# Altium PCB fotolitoTop.PcbDoc (part 2 of 4)
Units mil, origin at the board's own origin, x right, y up, seen from the top; angles counter-clockwise.
Board outline 7874.02 x 11220.47 mil, 2 copper layers (Top Layer, Bottom Layer); 110 components, 0 nets, 500 pads, 136 vias.
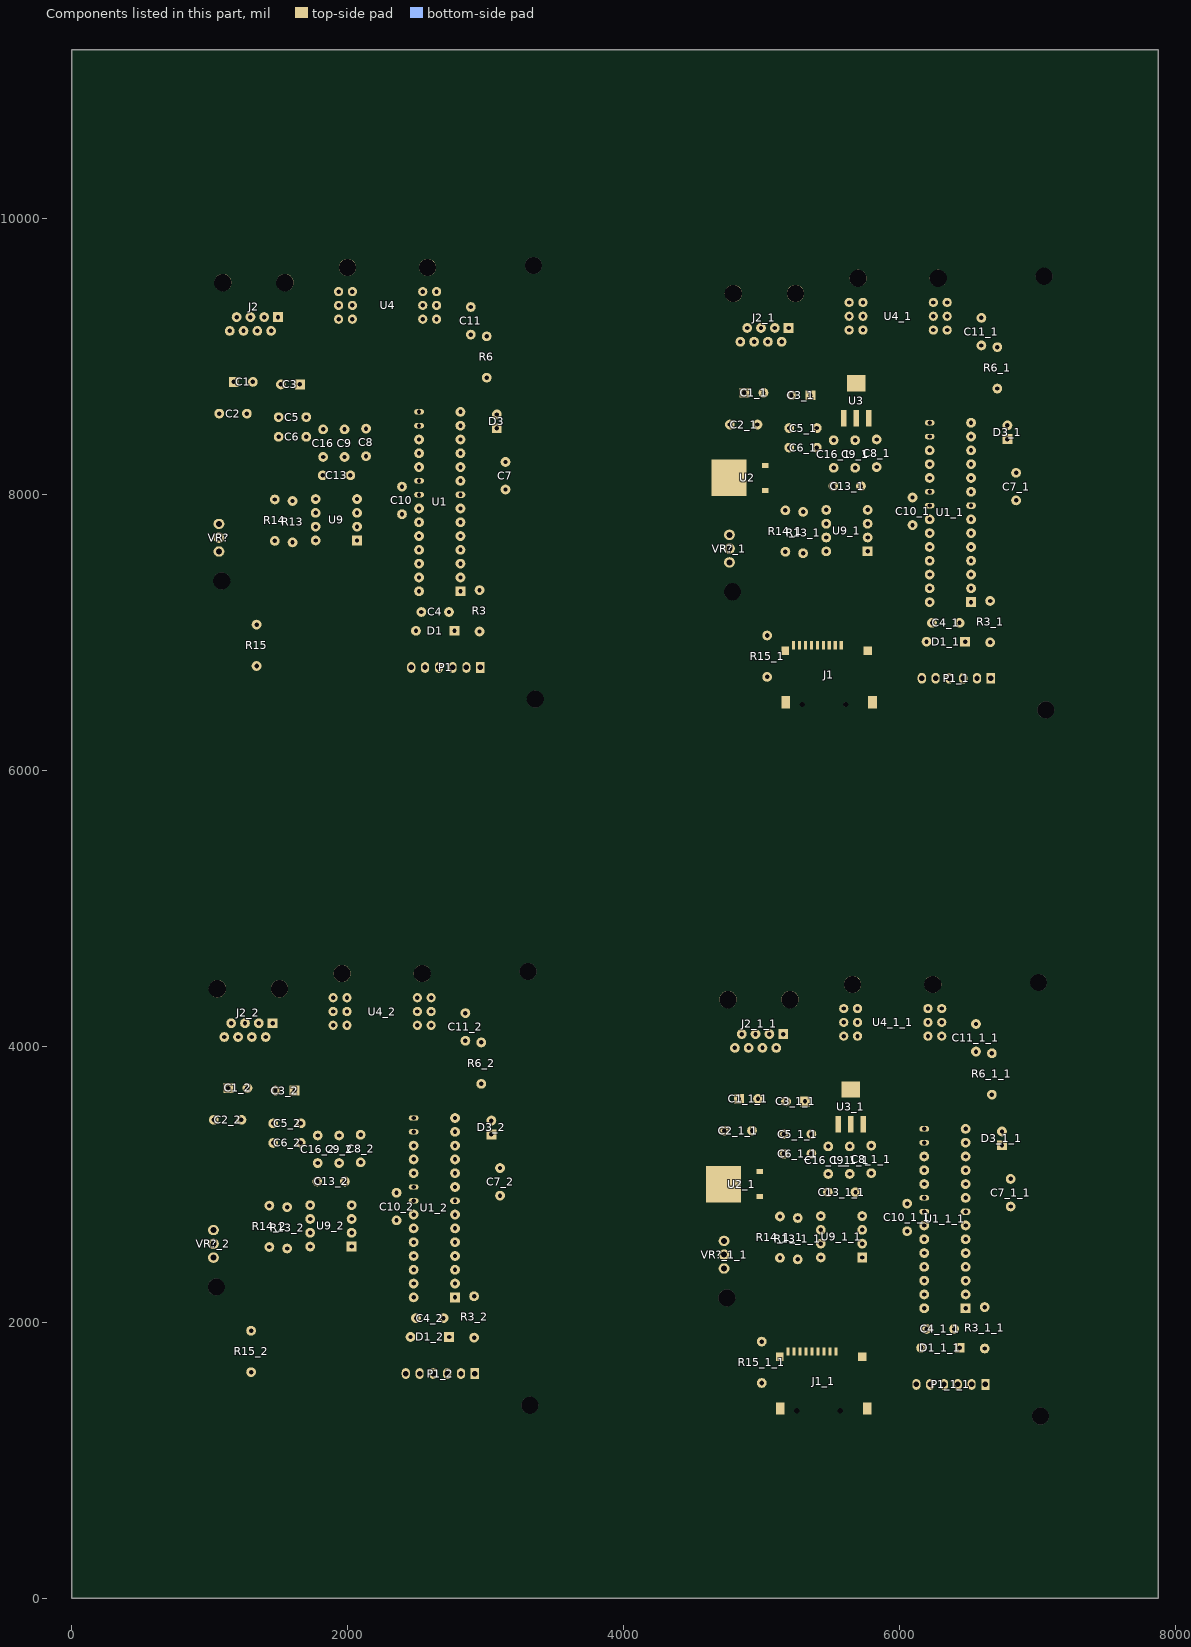
[diagram p2: the components of this part, seen from the top]

## Via types
v1: diameter 70.87, hole 27.56, Top Layer to Bottom Layer, 136 vias

## Nets (pads, with @x,y where several pads share a name; then routed paths per layer and width w, separated by ;. In a path a pad name is that pad's centre, name@x,y a point inside that pad or via, vN(x,y) a via of type N, cw(c..) or ccw(c..) an arc to the next point about the centre after c; other vN are vias at no path point) (continued)
copper on no net: (continued)
  Top Layer w1: 6833.5,2047.09 6833.5,2105.09 ; 6834.5,2042.09 6834.5,2110.09 ; 6835.5,2039.09 6835.5,2113.09 ; 6835.5,2087.09 6835.5,2103.09 ; 6836.5,1798.09 6836.5,1915.09 ; 6836.5,2036.09 6836.5,2117.09 ; 6836.5,2079.09 6836.5,2112.09 ; 6836.5,2234.09 6836.5,2301.09 ; 6837.5,1798.09 6837.5,1923.09 ; 6837.5,2033.09 6837.5,2119.09 ; 6837.5,2071.09 6837.5,2121.09 ; 6837.5,2234.09 6837.5,2301.09 ; 6838.5,1798.09 6838.5,1931.09 ; 6838.5,2031.09 6838.5,2122.09 ; 6838.5,2234.09 6838.5,2301.09 ; 6839.5,1798.09 6839.5,1934.09 ; 6839.5,2029.09 6839.5,2125.09 ; 6839.5,2233.09 6839.5,2301.09 ; 6840.5,1798.09 6840.5,1939.09 ; 6840.5,2026.09 6840.5,2127.09 ; 6840.5,2233.09 6840.5,2302.09 ; 6841.5,1798.09 6841.5,1942.09 ; 6841.5,2025.09 6841.5,2129.09 ; 6841.5,2233.09 6841.5,2302.09 ; 6842.5,1798.09 6842.5,1945.09 ; 6842.5,2022.09 6842.5,2131.09 ; 6842.5,2233.09 6842.5,2302.09 ; 6843.5,1798.09 6843.5,1947.09 ; 6843.5,2021.09 6843.5,2132.09 ; 6843.5,2232.09 6843.5,2303.09 ; 6844.5,1798.09 6844.5,1949.09 ; 6844.5,2019.09 6844.5,2134.09 ; 6844.5,2232.09 6844.5,2303.09 ; 6845.5,1798.09 6845.5,1951.09 ; 6845.5,2018.09 6845.5,2135.09 ; 6845.5,2231.09 6845.5,2304.09 ; 6846.5,1798.09 6846.5,1953.09 ; 6846.5,2016.09 6846.5,2136.09 ; 6846.5,2231.09 6846.5,2304.09 ; 6847.5,1798.09 6847.5,1955.09 ; 6847.5,2015.09 6847.5,2138.09 ; 6847.5,2231.09 6847.5,2304.09 ; 6848.5,1798.09 6848.5,1956.09 ; 6848.5,2014.09 6848.5,2139.09 ; 6848.5,2230.09 6848.5,2305.09 ; 6849.5,1798.09 6849.5,1957.09 ; 6849.5,2013.09 6849.5,2140.09 ; 6849.5,2230.09 6849.5,2305.09 ; 6850.5,1798.09 6850.5,1959.09 ; 6850.5,2011.09 6850.5,2141.09 ; 6850.5,2230.09 6850.5,2306.09 ; 6851.5,1798.09 6851.5,1960.09 ; 6851.5,2011.09 6851.5,2142.09 ; 6851.5,2229.09 6851.5,2306.09 ; 6852.5,1798.09 6852.5,1961.09 ; 6852.5,2009.09 6852.5,2143.09 ; 6852.5,2229.09 6852.5,2306.09 ; 6853.5,1798.09 6853.5,1962.09 ; 6853.5,2008.09 6853.5,2144.09 ; 6853.5,2228.09 6853.5,2307.09 ; 6854.5,1798.09 6854.5,1963.09 ; 6854.5,2008.09 6854.5,2145.09 ; 6854.5,2228.09 6854.5,2307.09 ; 6855.5,1798.09 6855.5,1964.09 ; 6855.5,2007.09 6855.5,2146.09 ; 6855.5,2228.09 6855.5,2307.09 ; 6856.5,1798.09 6856.5,1965.09 ; 6856.5,2006.09 6856.5,2147.09 ; 6856.5,2227.09 6856.5,2307.09 ; 6857.5,1798.09 6857.5,1966.09 ; 6857.5,2005.09 6857.5,2148.09 ; 6857.5,2227.09 6857.5,2308.09 ; 6858.5,1798.09 6858.5,1967.09 ; 6858.5,2004.09 6858.5,2148.09 ; 6858.5,2227.09 6858.5,2308.09 ; 6859.5,1798.09 6859.5,1967.09 ; 6859.5,2004.09 6859.5,2149.09 ; 6859.5,2226.09 6859.5,2309.09 ; 6860.5,1798.09 6860.5,1914.09 ; 6860.5,1915.09 6860.5,1968.09 ; 6860.5,2003.09 6860.5,2149.09 ; 6860.5,2226.09 6860.5,2309.09 ; 6861.5,1798.09 6861.5,1914.09 ; 6861.5,1916.09 6861.5,1918.09 ; 6861.5,1920.09 6861.5,1969.09 ; 6861.5,2002.09 6861.5,2150.09 ; 6861.5,2225.09 6861.5,2309.09 ; 6862.5,1798.09 6862.5,1799.09 ; 6862.5,1801.09 6862.5,1811.09 ; 6862.5,1813.09 6862.5,1875.09 ; 6862.5,1882.09 6862.5,1885.09 ; 6862.5,1886.09 6862.5,1914.09 ; 6862.5,1920.09 6862.5,1970.09 ; 6862.5,2002.09 6862.5,2151.09 ; 6862.5,2225.09 6862.5,2310.09 ; 6863.5,1798.09 6863.5,1799.09 ; 6863.5,1801.09 6863.5,1805.09 ; 6863.5,1806.09 6863.5,1811.09 ; 6863.5,1813.09 6863.5,1860.09 ; 6863.5,1861.09 6863.5,1875.09 ; 6863.5,1882.09 6863.5,1884.09 ; 6863.5,1886.09 6863.5,1914.09 ; 6863.5,1916.09 6863.5,1970.09 ; 6863.5,2001.09 6863.5,2152.09 ; 6863.5,2225.09 6863.5,2310.09 ; 6864.5,1798.09 6864.5,1800.09 ; 6864.5,1801.09 6864.5,1805.09 ; 6864.5,1806.09 6864.5,1811.09 ; 6864.5,1813.09 6864.5,1835.09 ; 6864.5,1837.09 6864.5,1841.09 ; 6864.5,1843.09 6864.5,1860.09 ; 6864.5,1861.09 6864.5,1873.09 ; 6864.5,1885.09 6864.5,1914.09 ; 6864.5,1915.09 6864.5,1971.09 ; 6864.5,2001.09 6864.5,2152.09 ; 6864.5,2225.09 6864.5,2310.09 ; 6865.5,1798.09 6865.5,1799.09 ; 6865.5,1802.09 6865.5,1805.09 ; 6865.5,1806.09 6865.5,1810.09 ; 6865.5,1813.09 6865.5,1835.09 ; 6865.5,1837.09 6865.5,1841.09 ; 6865.5,1843.09 6865.5,1855.09 ; 6865.5,1856.09 6865.5,1859.09 ; 6865.5,1862.09 6865.5,1873.09 ; 6865.5,1884.09 6865.5,1914.09 ; 6865.5,1915.09 6865.5,1972.09 ; 6865.5,2000.09 6865.5,2153.09 ; 6865.5,2224.09 6865.5,2311.09 ; 6866.5,1798.09 6866.5,1799.09 ; 6866.5,1802.09 6866.5,1805.09 ; 6866.5,1807.09 6866.5,1810.09 ; 6866.5,1812.09 6866.5,1842.09 ; 6866.5,1843.09 6866.5,1855.09 ; 6866.5,1862.09 6866.5,1872.09 ; 6866.5,1883.09 6866.5,1900.09 ; 6866.5,1901.09 6866.5,1913.09 ; 6866.5,1916.09 6866.5,1972.09 ; 6866.5,1999.09 6866.5,2153.09 ; 6866.5,2224.09 6866.5,2311.09 ; 6867.5,1798.09 6867.5,1799.09 ; 6867.5,1802.09 6867.5,1805.09 ; 6867.5,1807.09 6867.5,1811.09 ; 6867.5,1812.09 6867.5,1842.09 ; 6867.5,1843.09 6867.5,1855.09 ; 6867.5,1862.09 6867.5,1872.09 ; 6867.5,1882.09 6867.5,1899.09 ; 6867.5,1901.09 6867.5,1913.09 ; 6867.5,1917.09 6867.5,1972.09 ; 6867.5,1999.09 6867.5,2154.09 ; 6867.5,2223.09 6867.5,2311.09 ; 6868.5,1798.09 6868.5,1799.09 ; 6868.5,1807.09 6868.5,1842.09 ; 6868.5,1843.09 6868.5,1854.09 ; 6868.5,1863.09 6868.5,1871.09 ; 6868.5,1884.09 6868.5,1890.09 ; 6868.5,1891.09 6868.5,1898.09 ; 6868.5,1900.09 6868.5,1911.09 ; 6868.5,1912.09 6868.5,1913.09 ; 6868.5,1918.09 6868.5,1973.09 ; 6868.5,1998.09 6868.5,2154.09 ; 6868.5,2223.09 6868.5,2312.09 ; 6869.5,1807.09 6869.5,1811.09 ; 6869.5,1812.09 6869.5,1816.09 ; 6869.5,1817.09 6869.5,1842.09 ; 6869.5,1843.09 6869.5,1853.09 ; 6869.5,1867.09 6869.5,1870.09 ; 6869.5,1887.09 6869.5,1889.09 ; 6869.5,1891.09 6869.5,1898.09 ; 6869.5,1901.09 6869.5,1914.09 ; 6869.5,1917.09 6869.5,1932.09 ; 6869.5,1933.09 6869.5,1973.09 ; 6869.5,1998.09 6869.5,2155.09 ; 6869.5,2223.09 6869.5,2312.09 ; 6870.5,1807.09 6870.5,1811.09 ; 6870.5,1812.09 6870.5,1814.09 ; 6870.5,1817.09 6870.5,1842.09 ; 6870.5,1843.09 6870.5,1852.09 ; 6870.5,1867.09 6870.5,1869.09 ; 6870.5,1887.09 6870.5,1889.09 ; 6870.5,1892.09 6870.5,1899.09 ; 6870.5,1901.09 6870.5,1931.09 ; 6870.5,1933.09 6870.5,1974.09 ; 6870.5,1998.09 6870.5,2155.09 ; 6870.5,2222.09 6870.5,2313.09 ; 6871.5,1807.09 6871.5,1812.09 ; 6871.5,1818.09 6871.5,1822.09 ; 6871.5,1823.09 6871.5,1842.09 ; 6871.5,1843.09 6871.5,1852.09 ; 6871.5,1892.09 6871.5,1899.09 ; 6871.5,1901.09 6871.5,1930.09 ; 6871.5,1933.09 6871.5,1974.09 ; 6871.5,1997.09 6871.5,2156.09 ; 6871.5,2222.09 6871.5,2313.09 ; 6872.5,1807.09 6872.5,1812.09 ; 6872.5,1823.09 6872.5,1851.09 ; 6872.5,1893.09 6872.5,1897.09 ; 6872.5,1900.09 6872.5,1910.09 ; 6872.5,1912.09 6872.5,1930.09 ; 6872.5,1932.09 6872.5,1975.09 ; 6872.5,1997.09 6872.5,2156.09 ; 6872.5,2222.09 6872.5,2313.09 ; 6872.87,7165.2 6872.87,7223.2 ; 6873.5,1807.09 6873.5,1812.09 ; 6873.5,1823.09 6873.5,1836.09 ; 6873.5,1838.09 6873.5,1842.09 ; 6873.5,1844.09 6873.5,1851.09 ; 6873.5,1899.09 6873.5,1911.09 ; 6873.5,1920.09 6873.5,1930.09 ; 6873.5,1934.09 6873.5,1975.09 ; 6873.5,1996.09 6873.5,2157.09 ; 6873.5,2221.09 6873.5,2314.09 ; 6873.87,7160.2 6873.87,7228.2 ; 6874.5,1807.09 6874.5,1812.09 ; 6874.5,1823.09 6874.5,1837.09 ; 6874.5,1839.09 6874.5,1841.09 ; 6874.5,1844.09 6874.5,1851.09 ; 6874.5,1900.09 6874.5,1911.09 ; 6874.5,1920.09 6874.5,1930.09 ; 6874.5,1935.09 6874.5,1975.09 ; 6874.5,1996.09 6874.5,2157.09 ; 6874.5,2221.09 6874.5,2314.09 ; 6874.87,7157.2 6874.87,7231.2 ; 6874.87,7205.2 6874.87,7221.2 ; 6875.5,1807.09 6875.5,1812.09 ; 6875.5,1823.09 6875.5,1838.09 ; 6875.5,1844.09 6875.5,1850.09 ; 6875.5,1901.09 6875.5,1910.09 ; 6875.5,1920.09 6875.5,1930.09 ; 6875.5,1935.09 6875.5,1975.09 ; 6875.5,1996.09 6875.5,2072.09 ; 6875.5,2079.09 6875.5,2157.09 ; 6875.5,2220.09 6875.5,2314.09 ; 6875.87,6916.2 6875.87,7033.2 ; 6875.87,7154.2 6875.87,7235.2 ; 6875.87,7197.2 6875.87,7230.2 ; 6875.87,7352.2 6875.87,7419.2 ; 6876.5,1807.09 6876.5,1811.09 ; 6876.5,1823.09 6876.5,1838.09 ; 6876.5,1844.09 6876.5,1850.09 ; 6876.5,1900.09 6876.5,1910.09 ; 6876.5,1920.09 6876.5,1930.09 ; 6876.5,1936.09 6876.5,1976.09 ; 6876.5,1995.09 6876.5,2066.09 ; 6876.5,2085.09 6876.5,2158.09 ; 6876.5,2220.09 6876.5,2315.09 ; 6876.87,6916.2 6876.87,7041.2 ; 6876.87,7151.2 6876.87,7237.2 ; 6876.87,7189.2 6876.87,7239.2 ; 6876.87,7352.2 6876.87,7419.2 ; 6877.5,1807.09 6877.5,1811.09 ; 6877.5,1823.09 6877.5,1834.09 ; 6877.5,1836.09 6877.5,1838.09 ; 6877.5,1844.09 6877.5,1850.09 ; 6877.5,1901.09 6877.5,1910.09 ; 6877.5,1920.09 6877.5,1930.09 ; 6877.5,1936.09 6877.5,1976.09 ; 6877.5,1995.09 6877.5,2063.09 ; 6877.5,2089.09 6877.5,2158.09 ; 6877.5,2220.09 6877.5,2315.09 ; 6877.87,6916.2 6877.87,7049.2 ; 6877.87,7149.2 6877.87,7240.2 ; 6877.87,7352.2 6877.87,7419.2 ; 6878.5,1807.09 6878.5,1812.09 ; 6878.5,1819.09 6878.5,1834.09 ; 6878.5,1844.09 6878.5,1850.09 ; 6878.5,1901.09 6878.5,1910.09 ; 6878.5,1920.09 6878.5,1930.09 ; 6878.5,1936.09 6878.5,1976.09 ; 6878.5,1995.09 6878.5,2061.09 ; 6878.5,2090.09 6878.5,2158.09 ; 6878.5,2219.09 6878.5,2315.09 ; 6878.87,6916.2 6878.87,7052.2 ; 6878.87,7147.2 6878.87,7243.2 ; 6878.87,7351.2 6878.87,7419.2 ; 6879.5,1807.09 6879.5,1812.09 ; 6879.5,1819.09 6879.5,1834.09 ; 6879.5,1844.09 6879.5,1850.09 ; 6879.5,1901.09 6879.5,1905.09 ; 6879.5,1906.09 6879.5,1910.09 ; 6879.5,1920.09 6879.5,1931.09 ; 6879.5,1935.09 6879.5,1976.09 ; 6879.5,1995.09 6879.5,2059.09 ; 6879.5,2092.09 6879.5,2159.09 ; 6879.5,2219.09 6879.5,2316.09 ; 6879.87,6916.2 6879.87,7057.2 ; 6879.87,7144.2 6879.87,7245.2 ; 6879.87,7351.2 6879.87,7420.2 ; 6880.5,1807.09 6880.5,1811.09 ; 6880.5,1819.09 6880.5,1834.09 ; 6880.5,1844.09 6880.5,1850.09 ; 6880.5,1901.09 6880.5,1905.09 ; 6880.5,1906.09 6880.5,1910.09 ; 6880.5,1920.09 6880.5,1931.09 ; 6880.5,1935.09 6880.5,1977.09 ; 6880.5,1994.09 6880.5,2058.09 ; 6880.5,2093.09 6880.5,2159.09 ; 6880.5,2219.09 6880.5,2316.09 ; 6880.87,6916.2 6880.87,7060.2 ; 6880.87,7143.2 6880.87,7247.2 ; 6880.87,7351.2 6880.87,7420.2 ; 6881.5,1807.09 6881.5,1811.09 ; 6881.5,1821.09 6881.5,1834.09 ; 6881.5,1845.09 6881.5,1850.09 ; 6881.5,1900.09 6881.5,1910.09 ; 6881.5,1919.09 6881.5,1931.09 ; 6881.5,1935.09 6881.5,1977.09 ; 6881.5,1994.09 6881.5,2057.09 ; 6881.5,2095.09 6881.5,2159.09 ; 6881.5,2218.09 6881.5,2316.09 ; 6881.87,6916.2 6881.87,7063.2 ; 6881.87,7140.2 6881.87,7249.2 ; 6881.87,7351.2 6881.87,7420.2 ; 6882.5,1807.09 6882.5,1812.09 ; 6882.5,1822.09 6882.5,1834.09 ; 6882.5,1845.09 6882.5,1850.09 ; 6882.5,1900.09 6882.5,1910.09 ; 6882.5,1919.09 6882.5,1930.09 ; 6882.5,1935.09 6882.5,1977.09 ; 6882.5,1994.09 6882.5,2056.09 ; 6882.5,2095.09 6882.5,2159.09 ; 6882.5,2218.09 6882.5,2317.09 ; 6882.87,6916.2 6882.87,7065.2 ; 6882.87,7139.2 6882.87,7250.2 ; 6882.87,7350.2 6882.87,7421.2 ; 6883.5,1807.09 6883.5,1812.09 ; 6883.5,1823.09 6883.5,1834.09 ; 6883.5,1845.09 6883.5,1850.09 ; 6883.5,1860.09 6883.5,1910.09 ; 6883.5,1919.09 6883.5,1930.09 ; 6883.5,1934.09 6883.5,1977.09 ; 6883.5,1994.09 6883.5,2055.09 ; 6883.5,2096.09 6883.5,2160.09 ; 6883.5,2218.09 6883.5,2317.09 ; 6883.87,6916.2 6883.87,7067.2 ; 6883.87,7137.2 6883.87,7252.2 ; 6883.87,7350.2 6883.87,7421.2 ; 6884.5,1808.09 6884.5,1811.09 ; 6884.5,1824.09 6884.5,1834.09 ; 6884.5,1845.09 6884.5,1850.09 ; 6884.5,1860.09 6884.5,1900.09 ; 6884.5,1903.09 6884.5,1910.09 ; 6884.5,1919.09 6884.5,1930.09 ; 6884.5,1932.09 6884.5,1977.09 ; 6884.5,1994.09 6884.5,2055.09 ; 6884.5,2097.09 6884.5,2160.09 ; 6884.5,2218.09 6884.5,2318.09 ; 6884.87,6916.2 6884.87,7069.2 ; 6884.87,7136.2 6884.87,7253.2 ; 6884.87,7349.2 6884.87,7422.2 ; 6885.5,1808.09 6885.5,1809.09 ; 6885.5,1826.09 6885.5,1834.09 ; 6885.5,1844.09 6885.5,1850.09 ; 6885.5,1860.09 6885.5,1901.09 ; 6885.5,1907.09 6885.5,1910.09 ; 6885.5,1920.09 6885.5,1930.09 ; 6885.5,1931.09 6885.5,1977.09 ; 6885.5,1993.09 6885.5,2055.09 ; 6885.5,2098.09 6885.5,2160.09 ; 6885.5,2217.09 6885.5,2318.09 ; 6885.87,6916.2 6885.87,7071.2 ; 6885.87,7134.2 6885.87,7254.2 ; 6885.87,7349.2 6885.87,7422.2 ; 6886.5,1828.09 6886.5,1834.09 ; 6886.5,1844.09 6886.5,1850.09 ; 6886.5,1860.09 6886.5,1901.09 ; 6886.5,1909.09 6886.5,1910.09 ; 6886.5,1920.09 6886.5,1930.09 ; 6886.5,1931.09 6886.5,1977.09 ; 6886.5,1993.09 6886.5,2054.09 ; 6886.5,2098.09 6886.5,2160.09 ; 6886.5,2217.09 6886.5,2318.09 ; 6886.87,6916.2 6886.87,7073.2 ; 6886.87,7133.2 6886.87,7256.2 ; 6886.87,7349.2 6886.87,7422.2 ; 6887.5,1828.09 6887.5,1834.09 ; 6887.5,1844.09 6887.5,1850.09 ; 6887.5,1860.09 6887.5,1900.09 ; 6887.5,1910.09 6887.5,1912.09 ; 6887.5,1920.09 6887.5,1930.09 ; 6887.5,1931.09 6887.5,1977.09 ; 6887.5,1993.09 6887.5,2054.09 ; 6887.5,2099.09 6887.5,2161.09 ; 6887.5,2216.09 6887.5,2319.09 ; 6887.87,6916.2 6887.87,7074.2 ; 6887.87,7132.2 6887.87,7257.2 ; 6887.87,7348.2 6887.87,7423.2 ; 6888.5,1828.09 6888.5,1835.09 ; 6888.5,1844.09 6888.5,1850.09 ; 6888.5,1860.09 6888.5,1900.09 ; 6888.5,1910.09 6888.5,1913.09 ; 6888.5,1920.09 6888.5,1930.09 ; 6888.5,1931.09 6888.5,1977.09 ; 6888.5,1993.09 6888.5,2054.09 ; 6888.5,2099.09 6888.5,2161.09 ; 6888.5,2216.09 6888.5,2319.09 ; 6888.87,6916.2 6888.87,7075.2 ; 6888.87,7131.2 6888.87,7258.2 ; 6888.87,7348.2 6888.87,7423.2 ; 6889.5,1827.09 6889.5,1835.09 ; 6889.5,1844.09 6889.5,1850.09 ; 6889.5,1860.09 6889.5,1900.09 ; 6889.5,1910.09 6889.5,1914.09 ; 6889.5,1920.09 6889.5,1924.09 ; 6889.5,1925.09 6889.5,1930.09 ; 6889.5,1932.09 6889.5,1957.09 ; 6889.5,1958.09 6889.5,1977.09 ; 6889.5,1993.09 6889.5,2054.09 ; 6889.5,2099.09 6889.5,2161.09 ; 6889.5,2216.09 6889.5,2319.09 ; 6889.87,6916.2 6889.87,7077.2 ; 6889.87,7129.2 6889.87,7259.2 ; 6889.87,7348.2 6889.87,7424.2 ; 6890.5,1825.09 6890.5,1835.09 ; 6890.5,1843.09 6890.5,1849.09 ; 6890.5,1860.09 6890.5,1900.09 ; 6890.5,1910.09 6890.5,1914.09 ; 6890.5,1920.09 6890.5,1924.09 ; 6890.5,1925.09 6890.5,1930.09 ; 6890.5,1933.09 6890.5,1956.09 ; 6890.5,1958.09 6890.5,1977.09 ; 6890.5,1993.09 6890.5,2054.09 ; 6890.5,2100.09 6890.5,2161.09 ; 6890.5,2215.09 6890.5,2320.09 ; 6890.87,6916.2 6890.87,7078.2 ; 6890.87,7129.2 6890.87,7260.2 ; 6890.87,7347.2 6890.87,7424.2 ; 6891.5,1826.09 6891.5,1829.09 ; 6891.5,1830.09 6891.5,1835.09 ; 6891.5,1843.09 6891.5,1849.09 ; 6891.5,1860.09 6891.5,1900.09 ; 6891.5,1905.09 6891.5,1907.09 ; 6891.5,1910.09 6891.5,1915.09 ; 6891.5,1920.09 6891.5,1923.09 ; 6891.5,1925.09 6891.5,1930.09 ; 6891.5,1934.09 6891.5,1955.09 ; 6891.5,1958.09 6891.5,1977.09 ; 6891.5,1993.09 6891.5,2054.09 ; 6891.5,2100.09 6891.5,2161.09 ; 6891.5,2215.09 6891.5,2320.09 ; 6891.87,6916.2 6891.87,7079.2 ; 6891.87,7127.2 6891.87,7261.2 ; 6891.87,7347.2 6891.87,7424.2 ; 6892.5,1829.09 6892.5,1834.09 ; 6892.5,1844.09 6892.5,1849.09 ; 6892.5,1860.09 6892.5,1900.09 ; 6892.5,1904.09 6892.5,1907.09 ; 6892.5,1910.09 6892.5,1916.09 ; 6892.5,1921.09 6892.5,1922.09 ; 6892.5,1925.09 6892.5,1930.09 ; 6892.5,1936.09 6892.5,1955.09 ; 6892.5,1958.09 6892.5,1977.09 ; 6892.5,1993.09 6892.5,2055.09 ; 6892.5,2101.09 6892.5,2161.09 ; 6892.5,2215.09 6892.5,2321.09 ; 6892.87,6916.2 6892.87,7080.2 ; 6892.87,7126.2 6892.87,7262.2 ; 6892.87,7346.2 6892.87,7425.2 ; 6893.5,1829.09 6893.5,1834.09 ; 6893.5,1844.09 6893.5,1849.09 ; 6893.5,1860.09 6893.5,1900.09 ; 6893.5,1903.09 6893.5,1907.09 ; 6893.5,1910.09 6893.5,1916.09 ; 6893.5,1925.09 6893.5,1930.09 ; 6893.5,1936.09 6893.5,1955.09 ; 6893.5,1958.09 6893.5,1967.09 ; 6893.5,1968.09 6893.5,1977.09 ; 6893.5,1993.09 6893.5,2055.09 ; 6893.5,2214.09 6893.5,2321.09 ; 6893.87,6916.2 6893.87,7081.2 ; 6893.87,7126.2 6893.87,7263.2 ; 6893.87,7346.2 6893.87,7425.2 ; 6894.5,1830.09 6894.5,1833.09 ; 6894.5,1843.09 6894.5,1849.09 ; 6894.5,1860.09 6894.5,1900.09 ; 6894.5,1903.09 6894.5,1907.09 ; 6894.5,1911.09 6894.5,1917.09 ; 6894.5,1926.09 6894.5,1930.09 ; 6894.5,1935.09 6894.5,1955.09 ; 6894.5,1958.09 6894.5,1966.09 ; 6894.5,1969.09 6894.5,1977.09 ; 6894.5,1993.09 6894.5,2056.09 ; 6894.5,2214.09 6894.5,2321.09 ; 6894.87,6916.2 6894.87,7082.2 ; 6894.87,7125.2 6894.87,7264.2 ; 6894.87,7346.2 6894.87,7425.2 ; 6895.5,1831.09 6895.5,1832.09 ; 6895.5,1843.09 6895.5,1848.09 ; 6895.5,1860.09 6895.5,1901.09 ; 6895.5,1902.09 6895.5,1907.09 ; 6895.5,1911.09 6895.5,1917.09 ; 6895.5,1926.09 6895.5,1931.09 ; 6895.5,1933.09 6895.5,1955.09 ; 6895.5,1958.09 6895.5,1965.09 ; 6895.5,1969.09 6895.5,1974.09 ; 6895.5,1975.09 6895.5,1977.09 ; 6895.5,1993.09 6895.5,2057.09 ; 6895.5,2213.09 6895.5,2322.09 ; 6895.87,6916.2 6895.87,7083.2 ; 6895.87,7124.2 6895.87,7265.2 ; 6895.87,7345.2 6895.87,7425.2 ; 6896.5,1843.09 6896.5,1848.09 ; 6896.5,1860.09 6896.5,1906.09 ; 6896.5,1911.09 6896.5,1917.09 ; 6896.5,1926.09 6896.5,1931.09 ; 6896.5,1933.09 6896.5,1955.09 ; 6896.5,1957.09 6896.5,1965.09 ; 6896.5,1969.09 6896.5,1973.09 ; 6896.5,1975.09 6896.5,1977.09 ; 6896.5,1993.09 6896.5,2058.09 ; 6896.5,2213.09 6896.5,2322.09 ; 6896.87,6916.2 6896.87,7084.2 ; 6896.87,7123.2 6896.87,7266.2 ; 6896.87,7345.2 6896.87,7426.2 ; 6897.5,1843.09 6897.5,1847.09 ; 6897.5,1860.09 6897.5,1906.09 ; 6897.5,1911.09 6897.5,1918.09 ; 6897.5,1926.09 6897.5,1931.09 ; 6897.5,1934.09 6897.5,1955.09 ; 6897.5,1957.09 6897.5,1964.09 ; 6897.5,1969.09 6897.5,1973.09 ; 6897.5,1974.09 6897.5,1977.09 ; 6897.5,1993.09 6897.5,2001.09 ; 6897.5,2002.09 6897.5,2059.09 ; 6897.5,2213.09 6897.5,2322.09 ; 6897.87,6916.2 6897.87,7085.2 ; 6897.87,7122.2 6897.87,7266.2 ; 6897.87,7345.2 6897.87,7426.2 ; 6898.5,1860.09 6898.5,1906.09 ; 6898.5,1911.09 6898.5,1918.09 ; 6898.5,1926.09 6898.5,1931.09 ; 6898.5,1935.09 6898.5,1956.09 ; 6898.5,1958.09 6898.5,1964.09 ; 6898.5,1969.09 6898.5,1973.09 ; 6898.5,1974.09 6898.5,1977.09 ; 6898.5,1993.09 6898.5,2061.09 ; 6898.5,2212.09 6898.5,2323.09 ; 6898.87,6916.2 6898.87,7085.2 ; 6898.87,7122.2 6898.87,7267.2 ; 6898.87,7344.2 6898.87,7427.2 ; 6899.5,1860.09 6899.5,1906.09 ; 6899.5,1911.09 6899.5,1918.09 ; 6899.5,1926.09 6899.5,1931.09 ; 6899.5,1936.09 6899.5,1956.09 ; 6899.5,1958.09 6899.5,1964.09 ; 6899.5,1969.09 6899.5,1972.09 ; 6899.5,1974.09 6899.5,1977.09 ; 6899.5,1993.09 6899.5,2064.09 ; 6899.5,2212.09 6899.5,2323.09 ; 6899.87,6916.2 6899.87,7032.2 ; 6899.87,7033.2 6899.87,7086.2 ; 6899.87,7121.2 6899.87,7267.2 ; 6899.87,7344.2 6899.87,7427.2 ; 6900.5,1860.09 6900.5,1906.09 ; 6900.5,1911.09 6900.5,1918.09 ; 6900.5,1926.09 6900.5,1931.09 ; 6900.5,1937.09 6900.5,1964.09 ; 6900.5,1969.09 6900.5,1973.09 ; 6900.5,1974.09 6900.5,1977.09 ; 6900.5,1993.09 6900.5,2066.09 ; 6900.5,2212.09 6900.5,2323.09 ; 6900.87,6916.2 6900.87,7032.2 ; 6900.87,7034.2 6900.87,7036.2 ; 6900.87,7038.2 6900.87,7087.2 ; 6900.87,7120.2 6900.87,7268.2 ; 6900.87,7343.2 6900.87,7427.2 ; 6901.5,1860.09 6901.5,1906.09 ; 6901.5,1911.09 6901.5,1918.09 ; 6901.5,1926.09 6901.5,1931.09 ; 6901.5,1937.09 6901.5,1964.09 ; 6901.5,1969.09 6901.5,1977.09 ; 6901.5,1993.09 6901.5,2011.09 ; 6901.5,2012.09 6901.5,2046.09 ; 6901.5,2047.09 6901.5,2069.09 ; 6901.5,2211.09 6901.5,2324.09 ; 6901.87,6916.2 6901.87,6917.2 ; 6901.87,6919.2 6901.87,6929.2 ; 6901.87,6931.2 6901.87,6993.2 ; 6901.87,7000.2 6901.87,7003.2 ; 6901.87,7004.2 6901.87,7032.2 ; 6901.87,7038.2 6901.87,7088.2 ; 6901.87,7120.2 6901.87,7269.2 ; 6901.87,7343.2 6901.87,7428.2 ; 6902.5,1860.09 6902.5,1906.09 ; 6902.5,1911.09 6902.5,1918.09 ; 6902.5,1926.09 6902.5,1931.09 ; 6902.5,1938.09 6902.5,1955.09 ; 6902.5,1957.09 6902.5,1964.09 ; 6902.5,1968.09 6902.5,1977.09 ; 6902.5,1993.09 6902.5,2011.09 ; 6902.5,2012.09 6902.5,2045.09 ; 6902.5,2048.09 6902.5,2072.09 ; 6902.5,2211.09 6902.5,2324.09 ; 6902.87,6916.2 6902.87,6917.2 ; 6902.87,6919.2 6902.87,6923.2 ; 6902.87,6924.2 6902.87,6929.2 ; 6902.87,6931.2 6902.87,6978.2 ; 6902.87,6979.2 6902.87,6993.2 ; 6902.87,7000.2 6902.87,7002.2 ; 6902.87,7004.2 6902.87,7032.2 ; 6902.87,7034.2 6902.87,7088.2 ; 6902.87,7119.2 6902.87,7270.2 ; 6902.87,7343.2 6902.87,7428.2 ; 6903.5,1860.09 6903.5,1906.09 ; 6903.5,1911.09 6903.5,1918.09 ; 6903.5,1926.09 6903.5,1931.09 ; 6903.5,1939.09 6903.5,1946.09 ; 6903.5,1947.09 6903.5,1955.09 ; 6903.5,1957.09 6903.5,1965.09 ; 6903.5,1968.09 6903.5,1977.09 ; 6903.5,1993.09 6903.5,2001.09 ; 6903.5,2002.09 6903.5,2011.09 ; 6903.5,2012.09 6903.5,2045.09 ; 6903.5,2048.09 6903.5,2076.09 ; 6903.5,2211.09 6903.5,2324.09 ; 6903.87,6916.2 6903.87,6918.2 ; 6903.87,6919.2 6903.87,6923.2 ; 6903.87,6924.2 6903.87,6929.2 ; 6903.87,6931.2 6903.87,6953.2 ; 6903.87,6955.2 6903.87,6959.2 ; 6903.87,6961.2 6903.87,6978.2 ; 6903.87,6979.2 6903.87,6991.2 ; 6903.87,7003.2 6903.87,7032.2 ; 6903.87,7033.2 6903.87,7089.2 ; 6903.87,7119.2 6903.87,7270.2 ; 6903.87,7343.2 6903.87,7428.2 ; 6904.5,1860.09 6904.5,1906.09 ; 6904.5,1911.09 6904.5,1918.09 ; 6904.5,1926.09 6904.5,1931.09 ; 6904.5,1939.09 6904.5,1947.09 ; 6904.5,1948.09 6904.5,1951.09 ; 6904.5,1956.09 6904.5,1965.09 ; 6904.5,1968.09 6904.5,1976.09 ; 6904.5,1993.09 6904.5,2001.09 ; 6904.5,2002.09 6904.5,2011.09 ; 6904.5,2012.09 6904.5,2046.09 ; 6904.5,2048.09 6904.5,2080.09 ; 6904.5,2210.09 6904.5,2325.09 ; 6904.87,6916.2 6904.87,6917.2 ; 6904.87,6920.2 6904.87,6923.2 ; 6904.87,6924.2 6904.87,6928.2 ; 6904.87,6931.2 6904.87,6953.2 ; 6904.87,6955.2 6904.87,6959.2 ; 6904.87,6961.2 6904.87,6973.2 ; 6904.87,6974.2 6904.87,6977.2 ; 6904.87,6980.2 6904.87,6991.2 ; 6904.87,7002.2 6904.87,7032.2 ; 6904.87,7033.2 6904.87,7090.2 ; 6904.87,7118.2 6904.87,7271.2 ; 6904.87,7342.2 6904.87,7429.2 ; 6905.5,1860.09 6905.5,1907.09 ; 6905.5,1911.09 6905.5,1918.09 ; 6905.5,1926.09 6905.5,1931.09 ; 6905.5,1939.09 6905.5,1951.09 ; 6905.5,1956.09 6905.5,1965.09 ; 6905.5,1969.09 6905.5,1976.09 ; 6905.5,1994.09 6905.5,1999.09 ; 6905.5,2002.09 6905.5,2011.09 ; 6905.5,2012.09 6905.5,2046.09 ; 6905.5,2047.09 6905.5,2084.09 ; 6905.5,2210.09 6905.5,2325.09 ; 6905.87,6916.2 6905.87,6917.2 ; 6905.87,6920.2 6905.87,6923.2 ; 6905.87,6925.2 6905.87,6928.2 ; 6905.87,6930.2 6905.87,6960.2 ; 6905.87,6961.2 6905.87,6973.2 ; 6905.87,6980.2 6905.87,6990.2 ; 6905.87,7001.2 6905.87,7018.2 ; 6905.87,7019.2 6905.87,7031.2 ; 6905.87,7034.2 6905.87,7090.2 ; 6905.87,7117.2 6905.87,7271.2 ; 6905.87,7342.2 6905.87,7429.2 ; 6906.5,1860.09 6906.5,1908.09 ; 6906.5,1910.09 6906.5,1917.09 ; 6906.5,1926.09 6906.5,1931.09 ; 6906.5,1940.09 6906.5,1947.09 ; 6906.5,1949.09 6906.5,1951.09 ; 6906.5,1957.09 6906.5,1965.09 ; 6906.5,1969.09 6906.5,1976.09 ; 6906.5,1994.09 6906.5,1995.09 ; 6906.5,2001.09 6906.5,2011.09 ; 6906.5,2012.09 6906.5,2046.09 ; 6906.5,2047.09 6906.5,2088.09 ; 6906.5,2210.09 6906.5,2325.09 ; 6906.87,6916.2 6906.87,6917.2 ; 6906.87,6920.2 6906.87,6923.2 ; 6906.87,6925.2 6906.87,6929.2 ; 6906.87,6930.2 6906.87,6960.2 ; 6906.87,6961.2 6906.87,6973.2 ; 6906.87,6980.2 6906.87,6990.2 ; 6906.87,7000.2 6906.87,7017.2 ; 6906.87,7019.2 6906.87,7031.2 ; 6906.87,7035.2 6906.87,7090.2 ; 6906.87,7117.2 6906.87,7272.2 ; 6906.87,7341.2 6906.87,7429.2 ; 6907.5,1860.09 6907.5,1917.09 ; 6907.5,1926.09 6907.5,1930.09 ; 6907.5,1940.09 6907.5,1946.09 ; 6907.5,1949.09 6907.5,1951.09 ; 6907.5,1959.09 6907.5,1965.09 ; 6907.5,1969.09 6907.5,1976.09 ; 6907.5,1994.09 6907.5,1995.09 ; 6907.5,2001.09 6907.5,2011.09 ; 6907.5,2012.09 6907.5,2092.09 ; 6907.5,2209.09 6907.5,2326.09 ; 6907.87,6916.2 6907.87,6917.2 ; 6907.87,6925.2 6907.87,6960.2 ; 6907.87,6961.2 6907.87,6972.2 ; 6907.87,6981.2 6907.87,6989.2 ; 6907.87,7002.2 6907.87,7008.2 ; 6907.87,7009.2 6907.87,7016.2 ; 6907.87,7018.2 6907.87,7029.2 ; 6907.87,7030.2 6907.87,7031.2 ; 6907.87,7036.2 6907.87,7091.2 ; 6907.87,7116.2 6907.87,7272.2 ; 6907.87,7341.2 6907.87,7430.2 ; 6908.5,1860.09 6908.5,1917.09 ; 6908.5,1926.09 6908.5,1930.09 ; 6908.5,1940.09 6908.5,1946.09 ; 6908.5,1959.09 6908.5,1965.09 ; 6908.5,1968.09 6908.5,1975.09 ; 6908.5,2001.09 6908.5,2096.09 ; 6908.5,2209.09 6908.5,2326.09 ; 6908.87,6925.2 6908.87,6929.2 ; 6908.87,6930.2 6908.87,6934.2 ; 6908.87,6935.2 6908.87,6960.2 ; 6908.87,6961.2 6908.87,6971.2 ; 6908.87,6985.2 6908.87,6988.2 ; 6908.87,7005.2 6908.87,7007.2 ; 6908.87,7009.2 6908.87,7016.2 ; 6908.87,7019.2 6908.87,7032.2 ; 6908.87,7035.2 6908.87,7050.2 ; 6908.87,7051.2 6908.87,7091.2 ; 6908.87,7116.2 6908.87,7273.2 ; 6908.87,7341.2 6908.87,7430.2 ; 6909.5,1860.09 6909.5,1916.09 ; 6909.5,1926.09 6909.5,1930.09 ; 6909.5,1940.09 6909.5,1947.09 ; 6909.5,1958.09 6909.5,1965.09 ; 6909.5,1968.09 6909.5,1975.09 ; 6909.5,2001.09 6909.5,2101.09 ; 6909.5,2208.09 6909.5,2327.09 ; 6909.87,6925.2 6909.87,6929.2 ; 6909.87,6930.2 6909.87,6932.2 ; 6909.87,6935.2 6909.87,6960.2 ; 6909.87,6961.2 6909.87,6970.2 ; 6909.87,6985.2 6909.87,6987.2 ; 6909.87,7005.2 6909.87,7007.2 ; 6909.87,7010.2 6909.87,7017.2 ; 6909.87,7019.2 6909.87,7049.2 ; 6909.87,7051.2 6909.87,7092.2 ; 6909.87,7116.2 6909.87,7273.2 ; 6909.87,7340.2 6909.87,7431.2 ; 6910.5,1860.09 6910.5,1916.09 ; 6910.5,1926.09 6910.5,1930.09 ; 6910.5,1941.09 6910.5,1951.09 ; 6910.5,1957.09 6910.5,1965.09 ; 6910.5,1969.09 6910.5,1975.09 ; 6910.5,2002.09 6910.5,2016.09 ; 6910.5,2017.09 6910.5,2104.09 ; 6910.5,2208.09 6910.5,2327.09 ; 6910.87,6925.2 6910.87,6930.2 ; 6910.87,6936.2 6910.87,6940.2 ; 6910.87,6941.2 6910.87,6960.2 ; 6910.87,6961.2 6910.87,6970.2 ; 6910.87,7010.2 6910.87,7017.2 ; 6910.87,7019.2 6910.87,7048.2 ; 6910.87,7051.2 6910.87,7092.2 ; 6910.87,7115.2 6910.87,7274.2 ; 6910.87,7340.2 6910.87,7431.2 ; 6911.5,1860.09 6911.5,1916.09 ; 6911.5,1926.09 6911.5,1929.09 ; 6911.5,1941.09 6911.5,1951.09 ; 6911.5,1957.09 6911.5,1965.09 ; 6911.5,1969.09 6911.5,1975.09 ; 6911.5,2002.09 6911.5,2016.09 ; 6911.5,2017.09 6911.5,2108.09 ; 6911.5,2208.09 6911.5,2327.09 ; 6911.87,6925.2 6911.87,6930.2 ; 6911.87,6941.2 6911.87,6969.2 ; 6911.87,7011.2 6911.87,7015.2 ; 6911.87,7018.2 6911.87,7028.2 ; 6911.87,7030.2 6911.87,7048.2 ; 6911.87,7050.2 6911.87,7093.2 ; 6911.87,7115.2 6911.87,7274.2 ; 6911.87,7340.2 6911.87,7431.2 ; 6912.5,1860.09 6912.5,1915.09 ; 6912.5,1926.09 6912.5,1929.09 ; 6912.5,1941.09 6912.5,1950.09 ; 6912.5,1958.09 6912.5,1965.09 ; 6912.5,1968.09 6912.5,1974.09 ; 6912.5,2003.09 6912.5,2015.09 ; 6912.5,2017.09 6912.5,2112.09 ; 6912.5,2207.09 6912.5,2327.09 ; 6912.87,6925.2 6912.87,6930.2 ; 6912.87,6941.2 6912.87,6954.2 ; 6912.87,6956.2 6912.87,6960.2 ; 6912.87,6962.2 6912.87,6969.2 ; 6912.87,7017.2 6912.87,7029.2 ; 6912.87,7038.2 6912.87,7048.2 ; 6912.87,7052.2 6912.87,7093.2 ; 6912.87,7114.2 6912.87,7275.2 ; 6912.87,7339.2 6912.87,7432.2 ; 6913.5,1860.09 6913.5,1914.09 ; 6913.5,1926.09 6913.5,1929.09 ; 6913.5,1941.09 6913.5,1949.09 ; 6913.5,1958.09 6913.5,1964.09 ; 6913.5,1969.09 6913.5,1974.09 ; 6913.5,2003.09 6913.5,2015.09 ; 6913.5,2017.09 6913.5,2046.09 ; 6913.5,2047.09 6913.5,2115.09 ; 6913.5,2207.09 6913.5,2328.09 ; 6913.87,6925.2 6913.87,6930.2 ; 6913.87,6941.2 6913.87,6955.2 ; 6913.87,6957.2 6913.87,6959.2 ; 6913.87,6962.2 6913.87,6969.2 ; 6913.87,7018.2 6913.87,7029.2 ; 6913.87,7038.2 6913.87,7048.2 ; 6913.87,7053.2 6913.87,7093.2 ; 6913.87,7114.2 6913.87,7275.2 ; 6913.87,7339.2 6913.87,7432.2 ; 6914.5,1860.09 6914.5,1913.09 ; 6914.5,1926.09 6914.5,1929.09 ; 6914.5,1941.09 6914.5,1948.09 ; 6914.5,1957.09 6914.5,1961.09 ; 6914.5,1962.09 6914.5,1963.09 ; 6914.5,1969.09 6914.5,1973.09 ; 6914.5,2004.09 6914.5,2013.09 ; 6914.5,2018.09 6914.5,2046.09 ; 6914.5,2047.09 6914.5,2119.09 ; 6914.5,2207.09 6914.5,2328.09 ; 6914.87,6925.2 6914.87,6930.2 ; 6914.87,6941.2 6914.87,6956.2 ; 6914.87,6962.2 6914.87,6968.2 ; 6914.87,7019.2 6914.87,7028.2 ; 6914.87,7038.2 6914.87,7048.2 ; 6914.87,7053.2 6914.87,7093.2 ; 6914.87,7114.2 6914.87,7190.2 ; 6914.87,7197.2 6914.87,7275.2 ; 6914.87,7338.2 6914.87,7432.2 ; 6915.5,1860.09 6915.5,1912.09 ; 6915.5,1926.09 6915.5,1928.09 ; 6915.5,1941.09 6915.5,1946.09 ; 6915.5,1957.09 6915.5,1961.09 ; 6915.5,1969.09 6915.5,1973.09 ; 6915.5,2004.09 6915.5,2011.09 ; 6915.5,2018.09 6915.5,2046.09 ; 6915.5,2047.09 6915.5,2121.09 ; 6915.5,2206.09 6915.5,2329.09 ; 6915.87,6925.2 6915.87,6929.2 ; 6915.87,6941.2 6915.87,6956.2 ; 6915.87,6962.2 6915.87,6968.2 ; 6915.87,7018.2 6915.87,7028.2 ; 6915.87,7038.2 6915.87,7048.2 ; 6915.87,7054.2 6915.87,7094.2 ; 6915.87,7113.2 6915.87,7184.2 ; 6915.87,7203.2 6915.87,7276.2 ; 6915.87,7338.2 6915.87,7433.2 ; 6916.5,1860.09 6916.5,1911.09 ; 6916.5,1926.09 6916.5,1928.09 ; 6916.5,1941.09 6916.5,1944.09 ; 6916.5,1957.09 6916.5,1961.09 ; 6916.5,1968.09 6916.5,1972.09 ; 6916.5,2004.09 6916.5,2011.09 ; 6916.5,2018.09 6916.5,2046.09 ; 6916.5,2047.09 6916.5,2125.09 ; 6916.5,2206.09 6916.5,2329.09 ; 6916.87,6925.2 6916.87,6929.2 ; 6916.87,6941.2 6916.87,6952.2 ; 6916.87,6954.2 6916.87,6956.2 ; 6916.87,6962.2 6916.87,6968.2 ; 6916.87,7019.2 6916.87,7028.2 ; 6916.87,7038.2 6916.87,7048.2 ; 6916.87,7054.2 6916.87,7094.2 ; 6916.87,7113.2 6916.87,7181.2 ; 6916.87,7207.2 6916.87,7276.2 ; 6916.87,7338.2 6916.87,7433.2 ; 6917.5,1860.09 6917.5,1909.09 ; 6917.5,1926.09 6917.5,1928.09 ; 6917.5,1940.09 6917.5,1944.09 ; 6917.5,1957.09 6917.5,1961.09 ; 6917.5,1968.09 6917.5,1972.09 ; 6917.5,2004.09 6917.5,2011.09 ; 6917.5,2019.09 6917.5,2046.09 ; 6917.5,2047.09 6917.5,2127.09 ; 6917.5,2205.09 6917.5,2329.09 ; 6917.87,6925.2 6917.87,6930.2 ; 6917.87,6937.2 6917.87,6952.2 ; 6917.87,6962.2 6917.87,6968.2 ; 6917.87,7019.2 6917.87,7028.2 ; 6917.87,7038.2 6917.87,7048.2 ; 6917.87,7054.2 6917.87,7094.2 ; 6917.87,7113.2 6917.87,7179.2 ; 6917.87,7208.2 6917.87,7276.2 ; 6917.87,7337.2 6917.87,7433.2 ; 6918.5,1860.09 6918.5,1907.09 ; 6918.5,1927.09 6918.5,1928.09 ; 6918.5,1940.09 6918.5,1943.09 ; 6918.5,1956.09 6918.5,1960.09 ; 6918.5,1969.09 6918.5,1972.09 ; 6918.5,2003.09 6918.5,2011.09 ; 6918.5,2013.09 6918.5,2015.09 ; 6918.5,2019.09 6918.5,2045.09 ; 6918.5,2047.09 6918.5,2129.09 ; 6918.5,2205.09 6918.5,2330.09 ; 6918.87,6925.2 6918.87,6930.2 ; 6918.87,6937.2 6918.87,6952.2 ; 6918.87,6962.2 6918.87,6968.2 ; 6918.87,7019.2 6918.87,7023.2 ; 6918.87,7024.2 6918.87,7028.2 ; 6918.87,7038.2 6918.87,7049.2 ; 6918.87,7053.2 6918.87,7094.2 ; 6918.87,7113.2 6918.87,7177.2 ; 6918.87,7210.2 6918.87,7277.2 ; 6918.87,7337.2 6918.87,7434.2 ; 6919.5,1860.09 6919.5,1904.09 ; 6919.5,1940.09 6919.5,1943.09 ; 6919.5,1956.09 6919.5,1960.09 ; 6919.5,1969.09 6919.5,1971.09 ; 6919.5,2003.09 6919.5,2011.09 ; 6919.5,2012.09 6919.5,2016.09 ; 6919.5,2019.09 6919.5,2045.09 ; 6919.5,2047.09 6919.5,2131.09 ; 6919.5,2205.09 6919.5,2330.09 ; 6919.87,6925.2 6919.87,6929.2 ; 6919.87,6937.2 6919.87,6952.2 ; 6919.87,6962.2 6919.87,6968.2 ; 6919.87,7019.2 6919.87,7023.2 ; 6919.87,7024.2 6919.87,7028.2 ; 6919.87,7038.2 6919.87,7049.2 ; 6919.87,7053.2 6919.87,7095.2 ; 6919.87,7112.2 6919.87,7176.2 ; 6919.87,7211.2 6919.87,7277.2 ; 6919.87,7337.2 6919.87,7434.2 ; 6920.5,1860.09 6920.5,1897.09 ; 6920.5,1940.09 6920.5,1942.09 ; 6920.5,1969.09 6920.5,1970.09 ; 6920.5,2004.09 6920.5,2016.09 ; 6920.5,2020.09 6920.5,2046.09 ; 6920.5,2047.09 6920.5,2056.09 ; 6920.5,2057.09 6920.5,2133.09 ; 6920.5,2204.09 6920.5,2330.09 ; 6920.87,6925.2 6920.87,6929.2 ; 6920.87,6939.2 6920.87,6952.2 ; 6920.87,6963.2 6920.87,6968.2 ; 6920.87,7018.2 6920.87,7028.2 ; 6920.87,7037.2 6920.87,7049.2 ; 6920.87,7053.2 6920.87,7095.2 ; 6920.87,7112.2 6920.87,7175.2 ; 6920.87,7213.2 6920.87,7277.2 ; 6920.87,7336.2 6920.87,7434.2 ; 6921.5,1940.09 6921.5,1942.09 ; 6921.5,2004.09 6921.5,2016.09 ; 6921.5,2021.09 6921.5,2044.09 ; 6921.5,2048.09 6921.5,2056.09 ; 6921.5,2057.09 6921.5,2074.09 ; 6921.5,2075.09 6921.5,2135.09 ; 6921.5,2204.09 6921.5,2331.09 ; 6921.87,6925.2 6921.87,6930.2 ; 6921.87,6940.2 6921.87,6952.2 ; 6921.87,6963.2 6921.87,6968.2 ; 6921.87,7018.2 6921.87,7028.2 ; 6921.87,7037.2 6921.87,7048.2 ; 6921.87,7053.2 6921.87,7095.2 ; 6921.87,7112.2 6921.87,7174.2 ; 6921.87,7213.2 6921.87,7277.2 ; 6921.87,7336.2 6921.87,7435.2 ; 6922.5,2004.09 6922.5,2016.09 ; 6922.5,2022.09 6922.5,2024.09 ; 6922.5,2025.09 6922.5,2028.09 ; 6922.5,2030.09 6922.5,2043.09 ; 6922.5,2048.09 6922.5,2055.09 ; 6922.5,2058.09 6922.5,2073.09 ; 6922.5,2075.09 6922.5,2137.09 ; 6922.5,2204.09 6922.5,2331.09 ; 6922.87,6925.2 6922.87,6930.2 ; 6922.87,6941.2 6922.87,6952.2 ; 6922.87,6963.2 6922.87,6968.2 ; 6922.87,6978.2 6922.87,7028.2 ; 6922.87,7037.2 6922.87,7048.2 ; 6922.87,7052.2 6922.87,7095.2 ; 6922.87,7112.2 6922.87,7173.2 ; 6922.87,7214.2 6922.87,7278.2 ; 6922.87,7336.2 6922.87,7435.2 ; 6923.5,2004.09 6923.5,2016.09 ; 6923.5,2026.09 6923.5,2027.09 ; 6923.5,2030.09 6923.5,2043.09 ; 6923.5,2048.09 6923.5,2055.09 ; 6923.5,2059.09 6923.5,2073.09 ; 6923.5,2074.09 6923.5,2139.09 ; 6923.5,2203.09 6923.5,2331.09 ; 6923.87,6926.2 6923.87,6929.2 ; 6923.87,6942.2 6923.87,6952.2 ; 6923.87,6963.2 6923.87,6968.2 ; 6923.87,6978.2 6923.87,7018.2 ; 6923.87,7021.2 6923.87,7028.2 ; 6923.87,7037.2 6923.87,7048.2 ; 6923.87,7050.2 6923.87,7095.2 ; 6923.87,7112.2 6923.87,7173.2 ; 6923.87,7215.2 6923.87,7278.2 ; 6923.87,7336.2 6923.87,7436.2 ; 6924.5,2004.09 6924.5,2011.09 ; 6924.5,2031.09 6924.5,2043.09 ; 6924.5,2048.09 6924.5,2053.09 ; 6924.5,2059.09 6924.5,2141.09 ; 6924.5,2203.09 6924.5,2332.09 ; 6924.87,6926.2 6924.87,6927.2 ; 6924.87,6944.2 6924.87,6952.2 ; 6924.87,6962.2 6924.87,6968.2 ; 6924.87,6978.2 6924.87,7019.2 ; 6924.87,7025.2 6924.87,7028.2 ; 6924.87,7038.2 6924.87,7048.2 ; 6924.87,7049.2 6924.87,7095.2 ; 6924.87,7111.2 6924.87,7173.2 ; 6924.87,7216.2 6924.87,7278.2 ; 6924.87,7335.2 6924.87,7436.2 ; 6925.5,2004.09 6925.5,2010.09 ; 6925.5,2031.09 6925.5,2043.09 ; 6925.5,2048.09 6925.5,2053.09 ; 6925.5,2060.09 6925.5,2142.09 ; 6925.5,2203.09 6925.5,2332.09 ; 6925.87,6946.2 6925.87,6952.2 ; 6925.87,6962.2 6925.87,6968.2 ; 6925.87,6978.2 6925.87,7019.2 ; 6925.87,7027.2 6925.87,7028.2 ; 6925.87,7038.2 6925.87,7048.2 ; 6925.87,7049.2 6925.87,7095.2 ; 6925.87,7111.2 6925.87,7172.2 ; 6925.87,7216.2 6925.87,7278.2 ; 6925.87,7335.2 6925.87,7436.2 ; 6926.5,2004.09 6926.5,2009.09 ; 6926.5,2032.09 6926.5,2043.09 ; 6926.5,2048.09 6926.5,2052.09 ; 6926.5,2060.09 6926.5,2072.09 ; 6926.5,2073.09 6926.5,2108.09 ; 6926.5,2110.09 6926.5,2144.09 ; 6926.5,2202.09 6926.5,2333.09 ; 6926.87,6946.2 6926.87,6952.2 ; 6926.87,6962.2 6926.87,6968.2 ; 6926.87,6978.2 6926.87,7018.2 ; 6926.87,7028.2 6926.87,7030.2 ; 6926.87,7038.2 6926.87,7048.2 ; 6926.87,7049.2 6926.87,7095.2 ; 6926.87,7111.2 6926.87,7172.2 ; 6926.87,7217.2 6926.87,7279.2 ; 6926.87,7334.2 6926.87,7437.2 ; 6927.5,2004.09 6927.5,2008.09 ; 6927.5,2032.09 6927.5,2043.09 ; 6927.5,2049.09 6927.5,2052.09 ; 6927.5,2060.09 6927.5,2072.09 ; 6927.5,2073.09 6927.5,2108.09 ; 6927.5,2110.09 6927.5,2145.09 ; 6927.5,2202.09 6927.5,2333.09 ; 6927.87,6946.2 6927.87,6953.2 ; 6927.87,6962.2 6927.87,6968.2 ; 6927.87,6978.2 6927.87,7018.2 ; 6927.87,7028.2 6927.87,7031.2 ; 6927.87,7038.2 6927.87,7048.2 ; 6927.87,7049.2 6927.87,7095.2 ; 6927.87,7111.2 6927.87,7172.2 ; 6927.87,7217.2 6927.87,7279.2 ; 6927.87,7334.2 6927.87,7437.2 ; 6928.5,2005.09 6928.5,2007.09 ; 6928.5,2031.09 6928.5,2043.09 ; 6928.5,2049.09 6928.5,2052.09 ; 6928.5,2060.09 6928.5,2071.09 ; 6928.5,2073.09 6928.5,2088.09 ; 6928.5,2090.09 6928.5,2108.09 ; 6928.5,2110.09 6928.5,2147.09 ; 6928.5,2202.09 6928.5,2333.09 ; 6928.87,6945.2 6928.87,6953.2 ; 6928.87,6962.2 6928.87,6968.2 ; 6928.87,6978.2 6928.87,7018.2 ; 6928.87,7028.2 6928.87,7032.2 ; 6928.87,7038.2 6928.87,7042.2 ; 6928.87,7043.2 6928.87,7048.2 ; 6928.87,7050.2 6928.87,7075.2 ; 6928.87,7076.2 6928.87,7095.2 ; 6928.87,7111.2 6928.87,7172.2 ; 6928.87,7217.2 6928.87,7279.2 ; 6928.87,7334.2 6928.87,7437.2 ; 6929.5,2005.09 6929.5,2007.09 ; 6929.5,2031.09 6929.5,2037.09 ; 6929.5,2038.09 6929.5,2044.09 ; 6929.5,2049.09 6929.5,2051.09 ; 6929.5,2060.09 6929.5,2070.09 ; 6929.5,2072.09 6929.5,2087.09 ; 6929.5,2091.09 6929.5,2108.09 ; 6929.5,2110.09 6929.5,2148.09 ; 6929.5,2201.09 6929.5,2334.09 ; 6929.87,6943.2 6929.87,6953.2 ; 6929.87,6961.2 6929.87,6967.2 ; 6929.87,6978.2 6929.87,7018.2 ; 6929.87,7028.2 6929.87,7032.2 ; 6929.87,7038.2 6929.87,7042.2 ; 6929.87,7043.2 6929.87,7048.2 ; 6929.87,7051.2 6929.87,7074.2 ; 6929.87,7076.2 6929.87,7095.2 ; 6929.87,7111.2 6929.87,7172.2 ; 6929.87,7218.2 6929.87,7279.2 ; 6929.87,7333.2 6929.87,7438.2 ; 6930.5,2039.09 6930.5,2044.09 ; 6930.5,2061.09 6930.5,2069.09 ; 6930.5,2073.09 6930.5,2084.09 ; 6930.5,2092.09 6930.5,2108.09 ; 6930.5,2112.09 6930.5,2149.09 ; 6930.5,2201.09 6930.5,2334.09 ; 6930.87,6944.2 6930.87,6947.2 ; 6930.87,6948.2 6930.87,6953.2 ; 6930.87,6961.2 6930.87,6967.2 ; 6930.87,6978.2 6930.87,7018.2 ; 6930.87,7023.2 6930.87,7025.2 ; 6930.87,7028.2 6930.87,7033.2 ; 6930.87,7038.2 6930.87,7041.2 ; 6930.87,7043.2 6930.87,7048.2 ; 6930.87,7052.2 6930.87,7073.2 ; 6930.87,7076.2 6930.87,7095.2 ; 6930.87,7111.2 6930.87,7172.2 ; 6930.87,7218.2 6930.87,7279.2 ; 6930.87,7333.2 6930.87,7438.2 ; 6931.5,2039.09 6931.5,2044.09 ; 6931.5,2061.09 6931.5,2066.09 ; 6931.5,2067.09 6931.5,2068.09 ; 6931.5,2074.09 6931.5,2077.09 ; 6931.5,2078.09 6931.5,2084.09 ; 6931.5,2093.09 6931.5,2096.09 ; 6931.5,2098.09 6931.5,2109.09 ; 6931.5,2113.09 6931.5,2141.09 ; 6931.5,2143.09 6931.5,2147.09 ; 6931.5,2148.09 6931.5,2149.09 ; 6931.5,2201.09 6931.5,2334.09 ; 6931.87,6947.2 6931.87,6952.2 ; 6931.87,6962.2 6931.87,6967.2 ; 6931.87,6978.2 6931.87,7018.2 ; 6931.87,7022.2 6931.87,7025.2 ; 6931.87,7028.2 6931.87,7034.2 ; 6931.87,7039.2 6931.87,7040.2 ; 6931.87,7043.2 6931.87,7048.2 ; 6931.87,7054.2 6931.87,7073.2 ; 6931.87,7076.2 6931.87,7095.2 ; 6931.87,7111.2 6931.87,7173.2 ; 6931.87,7219.2 6931.87,7279.2 ; 6931.87,7333.2 6931.87,7439.2 ; 6932.5,2039.09 6932.5,2044.09 ; 6932.5,2061.09 6932.5,2066.09 ; 6932.5,2075.09 6932.5,2076.09 ; 6932.5,2079.09 6932.5,2083.09 ; 6932.5,2094.09 6932.5,2095.09 ; 6932.5,2097.09 6932.5,2109.09 ; 6932.5,2114.09 6932.5,2131.09 ; 6932.5,2132.09 6932.5,2139.09 ; 6932.5,2143.09 6932.5,2147.09 ; 6932.5,2200.09 6932.5,2335.09 ; 6932.87,6947.2 6932.87,6952.2 ; 6932.87,6962.2 6932.87,6967.2 ; 6932.87,6978.2 6932.87,7018.2 ; 6932.87,7021.2 6932.87,7025.2 ; 6932.87,7028.2 6932.87,7034.2 ; 6932.87,7043.2 6932.87,7048.2 ; 6932.87,7054.2 6932.87,7073.2 ; 6932.87,7076.2 6932.87,7085.2 ; 6932.87,7086.2 6932.87,7095.2 ; 6932.87,7111.2 6932.87,7173.2 ; 6932.87,7332.2 6932.87,7439.2 ; 6933.5,2040.09 6933.5,2044.09 ; 6933.5,2061.09 6933.5,2065.09 ; 6933.5,2079.09 6933.5,2083.09 ; 6933.5,2097.09 6933.5,2109.09 ; 6933.5,2114.09 6933.5,2130.09 ; 6933.5,2132.09 6933.5,2139.09 ; 6933.5,2142.09 6933.5,2147.09 ; 6933.5,2200.09 6933.5,2335.09 ; 6933.87,6948.2 6933.87,6951.2 ; 6933.87,6961.2 6933.87,6967.2 ; 6933.87,6978.2 6933.87,7018.2 ; 6933.87,7021.2 6933.87,7025.2 ; 6933.87,7029.2 6933.87,7035.2 ; 6933.87,7044.2 6933.87,7048.2 ; 6933.87,7053.2 6933.87,7073.2 ; 6933.87,7076.2 6933.87,7084.2 ; 6933.87,7087.2 6933.87,7095.2 ; 6933.87,7111.2 6933.87,7174.2 ; 6933.87,7332.2 6933.87,7439.2 ; 6934.5,2040.09 6934.5,2043.09 ; 6934.5,2061.09 6934.5,2065.09 ; 6934.5,2079.09 6934.5,2083.09 ; 6934.5,2098.09 6934.5,2109.09 ; 6934.5,2114.09 6934.5,2129.09 ; 6934.5,2132.09 6934.5,2139.09 ; 6934.5,2142.09 6934.5,2147.09 ; 6934.5,2199.09 6934.5,2336.09 ; 6934.87,6949.2 6934.87,6950.2 ; 6934.87,6961.2 6934.87,6966.2 ; 6934.87,6978.2 6934.87,7019.2 ; 6934.87,7020.2 6934.87,7025.2 ; 6934.87,7029.2 6934.87,7035.2 ; 6934.87,7044.2 6934.87,7049.2 ; 6934.87,7051.2 6934.87,7073.2 ; 6934.87,7076.2 6934.87,7083.2 ; 6934.87,7087.2 6934.87,7092.2 ; 6934.87,7093.2 6934.87,7095.2 ; 6934.87,7111.2 6934.87,7175.2 ; 6934.87,7331.2 6934.87,7440.2 ; 6935.5,2062.09 6935.5,2064.09 ; 6935.5,2079.09 6935.5,2084.09 ; 6935.5,2099.09 6935.5,2102.09 ; 6935.5,2106.09 6935.5,2108.09 ; 6935.5,2115.09 6935.5,2121.09 ; 6935.5,2122.09 6935.5,2125.09 ; 6935.5,2133.09 6935.5,2138.09 ; 6935.5,2144.09 6935.5,2146.09 ; 6935.5,2199.09 6935.5,2201.09 ; 6935.5,2202.09 6935.5,2336.09 ; 6935.87,6961.2 6935.87,6966.2 ; 6935.87,6978.2 6935.87,7024.2 ; 6935.87,7029.2 6935.87,7035.2 ; 6935.87,7044.2 6935.87,7049.2 ; 6935.87,7051.2 6935.87,7073.2 ; 6935.87,7075.2 6935.87,7083.2 ; 6935.87,7087.2 6935.87,7091.2 ; 6935.87,7093.2 6935.87,7095.2 ; 6935.87,7111.2 6935.87,7176.2 ; 6935.87,7331.2 6935.87,7440.2 ; 6936.5,2062.09 6936.5,2064.09 ; 6936.5,2079.09 6936.5,2083.09 ; 6936.5,2117.09 6936.5,2120.09 ; 6936.5,2123.09 6936.5,2125.09 ; 6936.5,2134.09 6936.5,2137.09 ; 6936.5,2199.09 6936.5,2201.09 ; 6936.5,2203.09 6936.5,2336.09 ; 6936.87,6961.2 6936.87,6965.2 ; 6936.87,6978.2 6936.87,7024.2 ; 6936.87,7029.2 6936.87,7036.2 ; 6936.87,7044.2 6936.87,7049.2 ; 6936.87,7052.2 6936.87,7073.2 ; 6936.87,7075.2 6936.87,7082.2 ; 6936.87,7087.2 6936.87,7091.2 ; 6936.87,7092.2 6936.87,7095.2 ; 6936.87,7111.2 6936.87,7119.2 ; 6936.87,7120.2 6936.87,7177.2 ; 6936.87,7331.2 6936.87,7440.2 ; 6937.5,2079.09 6937.5,2083.09 ; 6937.5,2135.09 6937.5,2136.09 ; 6937.5,2198.09 6937.5,2200.09 ; 6937.5,2204.09 6937.5,2218.09 ; 6937.5,2219.09 6937.5,2270.09 ; 6937.5,2274.09 6937.5,2336.09 ; 6937.87,6978.2 6937.87,7024.2 ; 6937.87,7029.2 6937.87,7036.2 ; 6937.87,7044.2 6937.87,7049.2 ; 6937.87,7053.2 6937.87,7074.2 ; 6937.87,7076.2 6937.87,7082.2 ; 6937.87,7087.2 6937.87,7091.2 ; 6937.87,7092.2 6937.87,7095.2 ; 6937.87,7111.2 6937.87,7179.2 ; 6937.87,7330.2 6937.87,7441.2 ; 6938.5,2079.09 6938.5,2083.09 ; 6938.5,2209.09 6938.5,2213.09 ; 6938.5,2222.09 6938.5,2240.09 ; 6938.5,2242.09 6938.5,2246.09 ; 6938.5,2248.09 6938.5,2258.09 ; 6938.5,2260.09 6938.5,2263.09 ; 6938.5,2265.09 6938.5,2270.09 ; 6938.5,2275.09 6938.5,2294.09 ; 6938.5,2295.09 6938.5,2300.09 ; 6938.5,2301.09 6938.5,2337.09 ; 6938.87,6978.2 6938.87,7024.2 ; 6938.87,7029.2 6938.87,7036.2 ; 6938.87,7044.2 6938.87,7049.2 ; 6938.87,7054.2 6938.87,7074.2 ; 6938.87,7076.2 6938.87,7082.2 ; 6938.87,7087.2 6938.87,7090.2 ; 6938.87,7092.2 6938.87,7095.2 ; 6938.87,7111.2 6938.87,7182.2 ; 6938.87,7330.2 6938.87,7441.2 ; 6939.5,2079.09 6939.5,2083.09 ; 6939.5,2227.09 6939.5,2232.09 ; 6939.5,2234.09 6939.5,2239.09 ; 6939.5,2242.09 6939.5,2245.09 ; 6939.5,2251.09 6939.5,2257.09 ; 6939.5,2265.09 6939.5,2270.09 ; 6939.5,2276.09 6939.5,2294.09 ; 6939.5,2296.09 6939.5,2300.09 ; 6939.5,2303.09 6939.5,2337.09 ; 6939.87,6978.2 6939.87,7024.2 ; 6939.87,7029.2 6939.87,7036.2 ; 6939.87,7044.2 6939.87,7049.2 ; 6939.87,7055.2 6939.87,7082.2 ; 6939.87,7087.2 6939.87,7091.2 ; 6939.87,7092.2 6939.87,7095.2 ; 6939.87,7111.2 6939.87,7184.2 ; 6939.87,7330.2 6939.87,7441.2 ; 6940.5,2080.09 6940.5,2083.09 ; 6940.5,2227.09 6940.5,2230.09 ; 6940.5,2234.09 6940.5,2238.09 ; 6940.5,2243.09 6940.5,2244.09 ; 6940.5,2266.09 6940.5,2269.09 ; 6940.5,2277.09 6940.5,2279.09 ; 6940.5,2281.09 6940.5,2289.09 ; 6940.5,2291.09 6940.5,2293.09 ; 6940.5,2298.09 6940.5,2299.09 ; 6940.5,2305.09 6940.5,2324.09 ; 6940.5,2334.09 6940.5,2336.09 ; 6940.87,6978.2 6940.87,7024.2 ; 6940.87,7029.2 6940.87,7036.2 ; 6940.87,7044.2 6940.87,7049.2 ; 6940.87,7055.2 6940.87,7082.2 ; 6940.87,7087.2 6940.87,7095.2 ; 6940.87,7111.2 6940.87,7129.2 ; 6940.87,7130.2 6940.87,7164.2 ; 6940.87,7165.2 6940.87,7187.2 ; 6940.87,7329.2 6940.87,7442.2 ; 6941.5,2227.09 6941.5,2229.09 ; 6941.5,2282.09 6941.5,2285.09 ; 6941.87,6978.2 6941.87,7024.2 ; 6941.87,7029.2 6941.87,7036.2 ; 6941.87,7044.2 6941.87,7049.2 ; 6941.87,7056.2 6941.87,7073.2 ; 6941.87,7075.2 6941.87,7082.2 ; 6941.87,7086.2 6941.87,7095.2 ; 6941.87,7111.2 6941.87,7129.2 ; 6941.87,7130.2 6941.87,7163.2 ; 6941.87,7166.2 6941.87,7190.2 ; 6941.87,7329.2 6941.87,7442.2 ; 6942.87,6978.2 6942.87,7024.2 ; 6942.87,7029.2 6942.87,7036.2 ; 6942.87,7044.2 6942.87,7049.2 ; 6942.87,7057.2 6942.87,7064.2 ; 6942.87,7065.2 6942.87,7073.2 ; 6942.87,7075.2 6942.87,7083.2 ; 6942.87,7086.2 6942.87,7095.2 ; 6942.87,7111.2 6942.87,7119.2 ; 6942.87,7120.2 6942.87,7129.2 ; 6942.87,7130.2 6942.87,7163.2 ; 6942.87,7166.2 6942.87,7194.2 ; 6942.87,7329.2 6942.87,7442.2 ; 6943.87,6978.2 6943.87,7024.2 ; 6943.87,7029.2 6943.87,7036.2 ; 6943.87,7044.2 6943.87,7049.2 ; 6943.87,7057.2 6943.87,7065.2 ; 6943.87,7066.2 6943.87,7069.2 ; 6943.87,7074.2 6943.87,7083.2 ; 6943.87,7086.2 6943.87,7094.2 ; 6943.87,7111.2 6943.87,7119.2 ; 6943.87,7120.2 6943.87,7129.2 ; 6943.87,7130.2 6943.87,7164.2 ; 6943.87,7166.2 6943.87,7198.2 ; 6943.87,7328.2 6943.87,7443.2 ; 6944.5,2214.09 6944.5,2216.09 ; 6944.5,2248.09 6944.5,2251.09 ; 6944.5,2271.09 6944.5,2272.09 ; 6944.5,2281.09 6944.5,2282.09 ; 6944.5,2294.09 6944.5,2296.09 ; 6944.5,2313.09 6944.5,2315.09 ; 6944.5,2329.09 6944.5,2331.09 ; 6944.87,6978.2 6944.87,7025.2 ; 6944.87,7029.2 6944.87,7036.2 ; 6944.87,7044.2 6944.87,7049.2 ; 6944.87,7057.2 6944.87,7069.2 ; 6944.87,7074.2 6944.87,7083.2 ; 6944.87,7087.2 6944.87,7094.2 ; 6944.87,7112.2 6944.87,7117.2 ; 6944.87,7120.2 6944.87,7129.2 ; 6944.87,7130.2 6944.87,7164.2 ; 6944.87,7165.2 6944.87,7202.2 ; 6944.87,7328.2 6944.87,7443.2 ; 6945.5,2196.09 6945.5,2197.09 ; 6945.5,2213.09 6945.5,2217.09 ; 6945.5,2234.09 6945.5,2236.09 ; 6945.5,2242.09 6945.5,2245.09 ; 6945.5,2247.09 6945.5,2251.09 ; 6945.5,2265.09 6945.5,2266.09 ; 6945.5,2270.09 6945.5,2273.09 ; 6945.5,2278.09 6945.5,2283.09 ; 6945.5,2287.09 6945.5,2292.09 ; 6945.5,2294.09 6945.5,2297.09 ; 6945.5,2300.09 6945.5,2302.09 ; 6945.5,2305.09 6945.5,2307.09 ; 6945.5,2312.09 6945.5,2320.09 ; 6945.5,2328.09 6945.5,2338.09 ; 6945.87,6978.2 6945.87,7026.2 ; 6945.87,7028.2 6945.87,7035.2 ; 6945.87,7044.2 6945.87,7049.2 ; 6945.87,7058.2 6945.87,7065.2 ; 6945.87,7067.2 6945.87,7069.2 ; 6945.87,7075.2 6945.87,7083.2 ; 6945.87,7087.2 6945.87,7094.2 ; 6945.87,7112.2 6945.87,7113.2 ; 6945.87,7119.2 6945.87,7129.2 ; 6945.87,7130.2 6945.87,7164.2 ; 6945.87,7165.2 6945.87,7206.2 ; 6945.87,7328.2 6945.87,7443.2 ; 6946.5,2195.09 6946.5,2198.09 ; 6946.5,2212.09 6946.5,2217.09 ; 6946.5,2230.09 6946.5,2236.09 ; 6946.5,2239.09 6946.5,2251.09 ; 6946.5,2252.09 6946.5,2259.09 ; 6946.5,2264.09 6946.5,2266.09 ; 6946.5,2269.09 6946.5,2272.09 ; 6946.5,2275.09 6946.5,2297.09 ; 6946.5,2299.09 6946.5,2321.09 ; 6946.5,2327.09 6946.5,2340.09 ; 6946.87,6978.2 6946.87,7035.2 ; 6946.87,7044.2 6946.87,7048.2 ; 6946.87,7058.2 6946.87,7064.2 ; 6946.87,7067.2 6946.87,7069.2 ; 6946.87,7077.2 6946.87,7083.2 ; 6946.87,7087.2 6946.87,7094.2 ; 6946.87,7112.2 6946.87,7113.2 ; 6946.87,7119.2 6946.87,7129.2 ; 6946.87,7130.2 6946.87,7210.2 ; 6946.87,7327.2 6946.87,7444.2 ; 6947.5,2093.09 6947.5,2095.09 ; 6947.5,2157.09 6947.5,2162.09 ; 6947.5,2195.09 6947.5,2198.09 ; 6947.5,2201.09 6947.5,2203.09 ; 6947.5,2211.09 6947.5,2220.09 ; 6947.5,2227.09 6947.5,2250.09 ; 6947.5,2252.09 6947.5,2272.09 ; 6947.5,2274.09 6947.5,2322.09 ; 6947.5,2327.09 6947.5,2340.09 ; 6947.87,6978.2 6947.87,7035.2 ; 6947.87,7044.2 6947.87,7048.2 ; 6947.87,7058.2 6947.87,7064.2 ; 6947.87,7077.2 6947.87,7083.2 ; 6947.87,7086.2 6947.87,7093.2 ; 6947.87,7119.2 6947.87,7214.2 ; 6947.87,7327.2 6947.87,7444.2 ; 6948.5,2092.09 6948.5,2096.09 ; 6948.5,2112.09 6948.5,2114.09 ; 6948.5,2156.09 6948.5,2162.09 ; 6948.5,2195.09 6948.5,2197.09 ; 6948.5,2200.09 6948.5,2204.09 ; 6948.5,2210.09 6948.5,2220.09 ; 6948.5,2223.09 6948.5,2250.09 ; 6948.5,2252.09 6948.5,2272.09 ; 6948.5,2273.09 6948.5,2340.09 ; 6948.87,6978.2 6948.87,7034.2 ; 6948.87,7044.2 6948.87,7048.2 ; 6948.87,7058.2 6948.87,7065.2 ; 6948.87,7076.2 6948.87,7083.2 ; 6948.87,7086.2 6948.87,7093.2 ; 6948.87,7119.2 6948.87,7219.2 ; 6948.87,7326.2 6948.87,7445.2 ; 6949.5,2090.09 6949.5,2096.09 ; 6949.5,2111.09 6949.5,2115.09 ; 6949.5,2154.09 6949.5,2163.09 ; 6949.5,2194.09 6949.5,2205.09 ; 6949.5,2208.09 6949.5,2272.09 ; 6949.5,2273.09 6949.5,2341.09 ; 6949.87,6978.2 6949.87,7034.2 ; 6949.87,7044.2 6949.87,7048.2 ; 6949.87,7059.2 6949.87,7069.2 ; 6949.87,7075.2 6949.87,7083.2 ; 6949.87,7087.2 6949.87,7093.2 ; 6949.87,7120.2 6949.87,7134.2 ; 6949.87,7135.2 6949.87,7222.2 ; 6949.87,7326.2 6949.87,7445.2 ; 6950.5,2058.09 6950.5,2060.09 ; 6950.5,2065.09 6950.5,2067.09 ; 6950.5,2078.09 6950.5,2080.09 ; 6950.5,2084.09 6950.5,2086.09 ; 6950.5,2089.09 6950.5,2096.09 ; 6950.5,2102.09 6950.5,2104.09 ; 6950.5,2108.09 6950.5,2110.09 ; 6950.5,2111.09 6950.5,2115.09 ; 6950.5,2119.09 6950.5,2122.09 ; 6950.5,2153.09 6950.5,2163.09 ; 6950.5,2194.09 6950.5,2205.09 ; 6950.5,2207.09 6950.5,2341.09 ; 6950.87,6978.2 6950.87,7034.2 ; 6950.87,7044.2 6950.87,7047.2 ; 6950.87,7059.2 6950.87,7069.2 ; 6950.87,7075.2 6950.87,7083.2 ; 6950.87,7087.2 6950.87,7093.2 ; 6950.87,7120.2 6950.87,7134.2 ; 6950.87,7135.2 6950.87,7226.2 ; 6950.87,7326.2 6950.87,7445.2 ; 6951.5,2057.09 6951.5,2060.09 ; 6951.5,2064.09 6951.5,2068.09 ; 6951.5,2077.09 6951.5,2081.09 ; 6951.5,2083.09 6951.5,2087.09 ; 6951.5,2088.09 6951.5,2097.09 ; 6951.5,2101.09 6951.5,2105.09 ; 6951.5,2107.09 6951.5,2110.09 ; 6951.5,2111.09 6951.5,2116.09 ; 6951.5,2119.09 6951.5,2123.09 ; 6951.5,2137.09 6951.5,2140.09 ; 6951.5,2148.09 6951.5,2150.09 ; 6951.5,2152.09 6951.5,2163.09 ; 6951.5,2193.09 6951.5,2206.09 ; 6951.5,2208.09 6951.5,2342.09 ; 6951.87,6978.2 6951.87,7033.2 ; 6951.87,7044.2 6951.87,7047.2 ; 6951.87,7059.2 6951.87,7068.2 ; 6951.87,7076.2 6951.87,7083.2 ; 6951.87,7086.2 6951.87,7092.2 ; 6951.87,7121.2 6951.87,7133.2 ; 6951.87,7135.2 6951.87,7230.2 ; 6951.87,7325.2 6951.87,7445.2